# Altium PCB Main_Power_Uint_3rd.PcbDoc (part 3 of 3)
Units mil, origin at the board's own origin, x right, y up, seen from the top; angles counter-clockwise.
Board outline 3820 x 5360 mil, 6 copper layers (Top Layer, GND1, PWR, SIG, GND2, Bottom Layer), stack 34.824 mil thick; 251 components, 157 nets, 795 pads, 616 vias.
Unrouted connection lines stored in the file: 8.
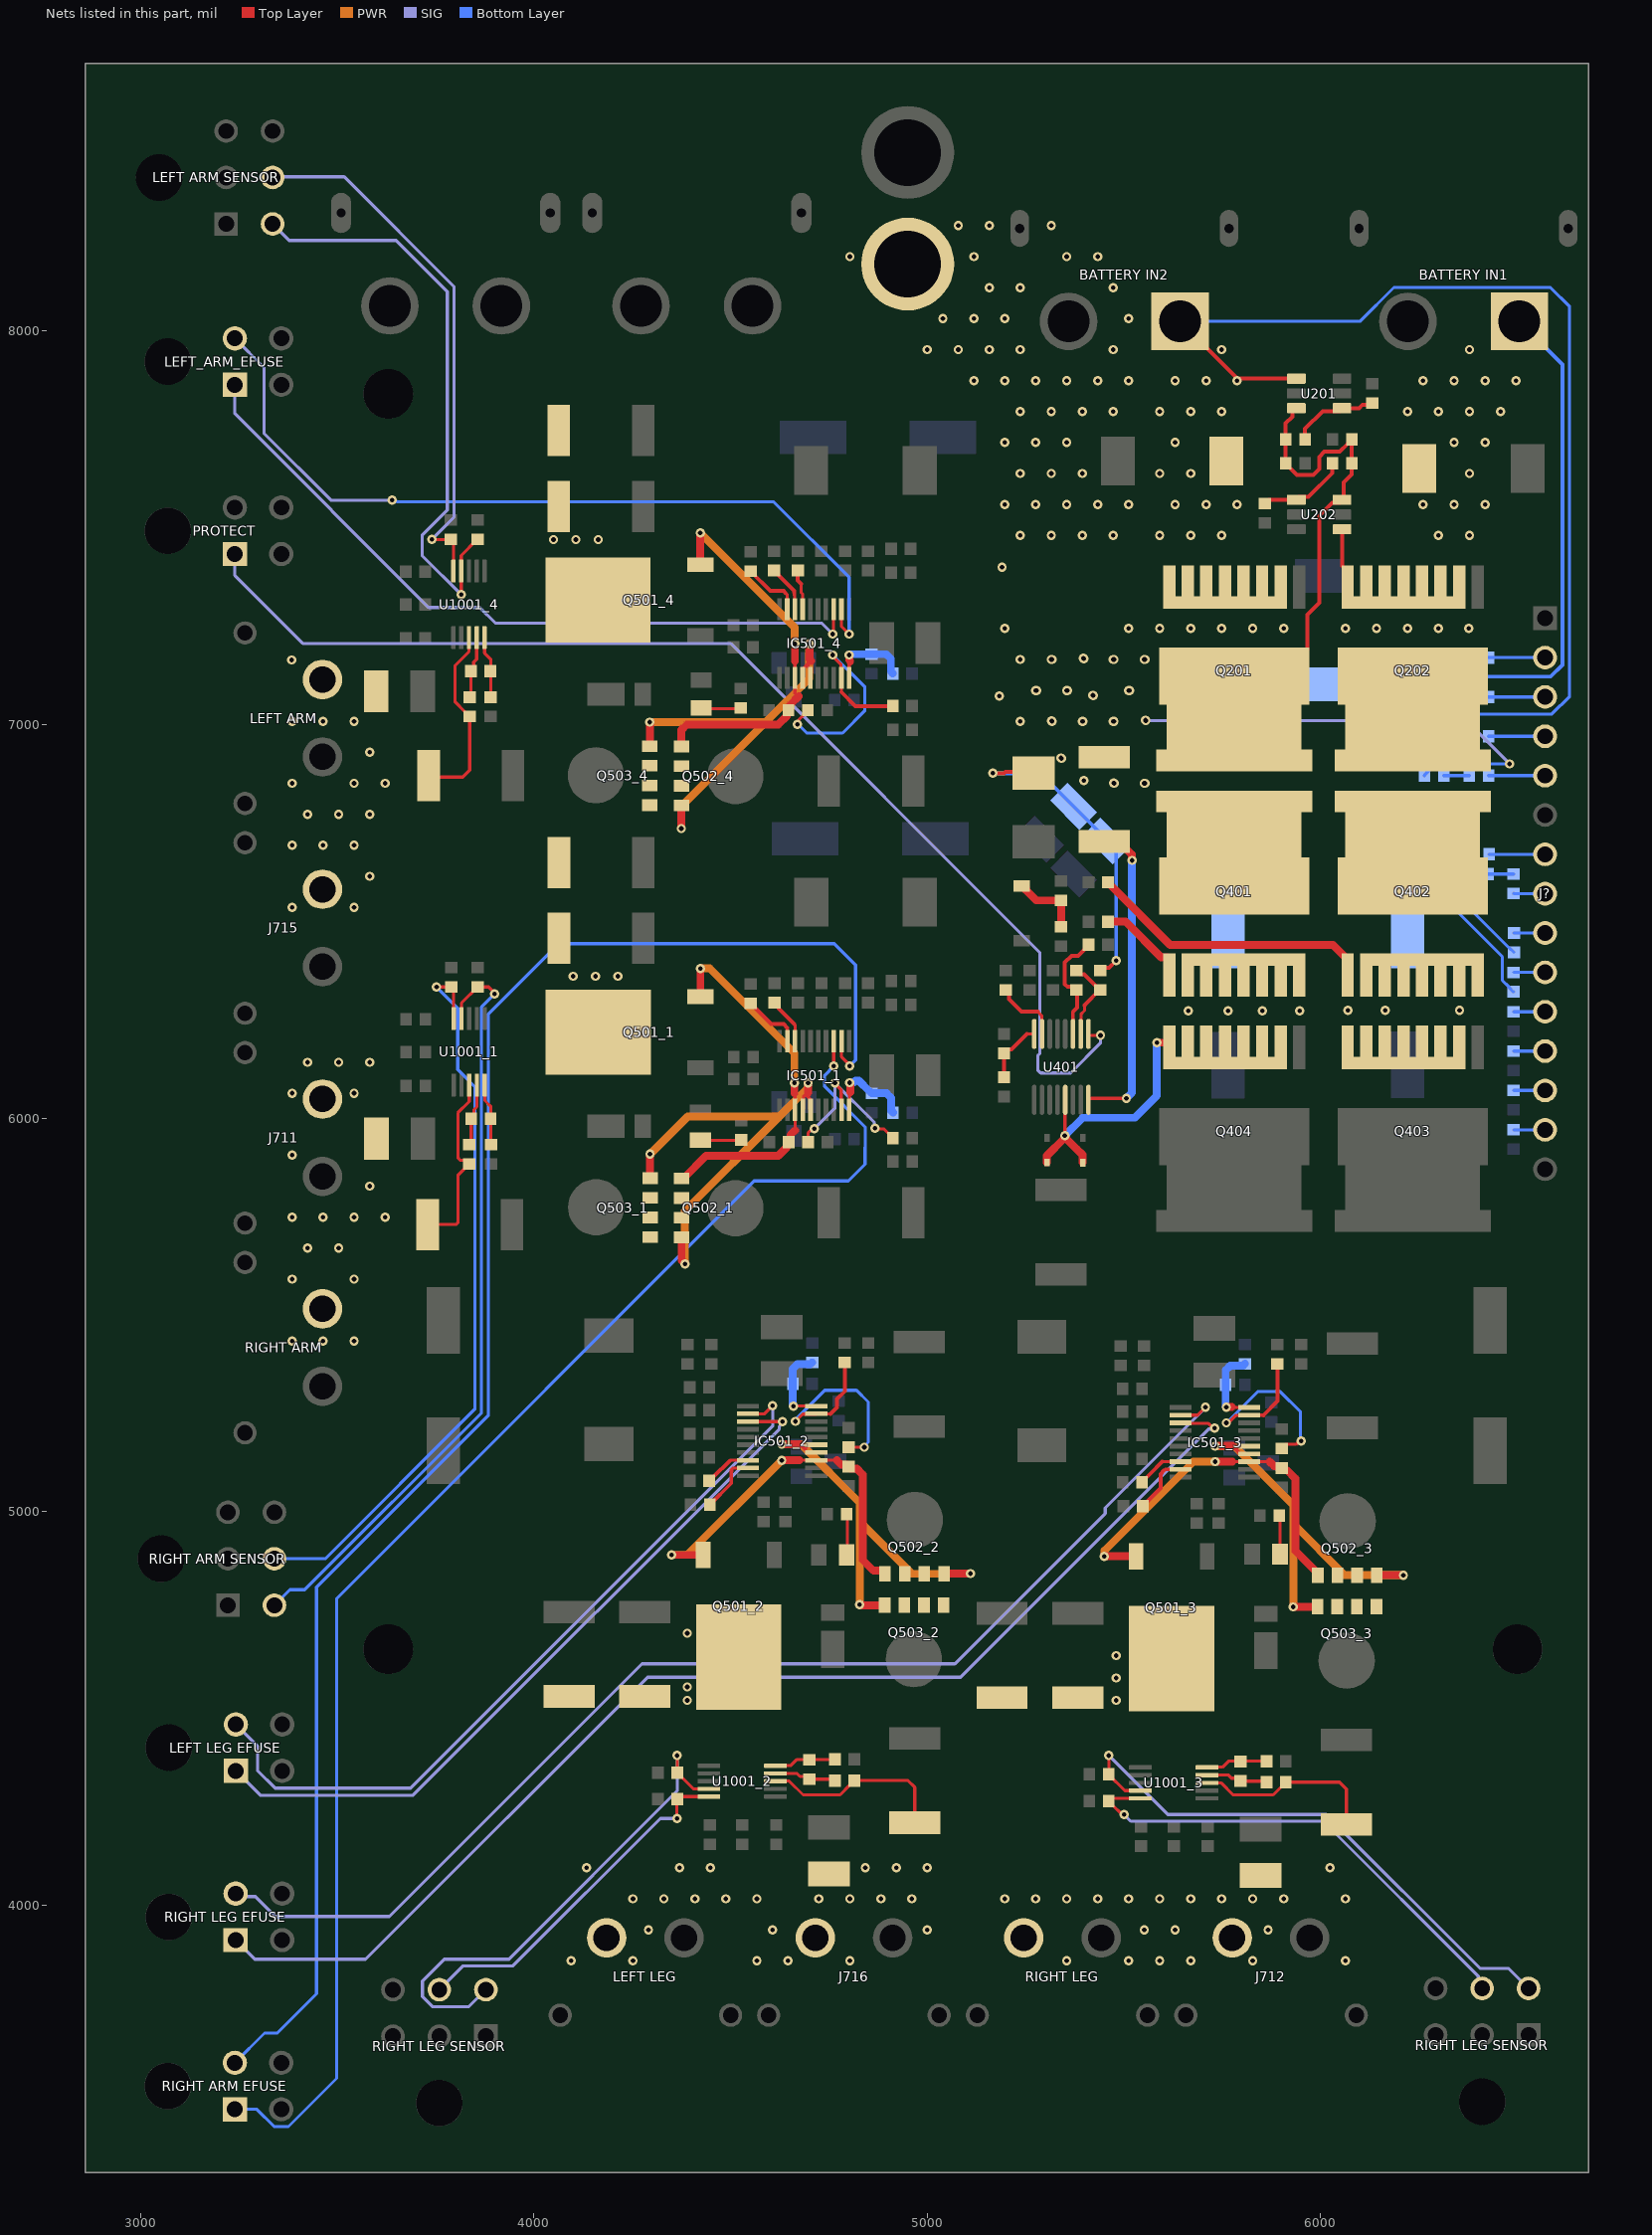
[diagram p7: the nets of this part, all layers, seen from the top]

## Via types
v1: diameter 23.62, hole 11.81, Top Layer to Bottom Layer, tented both sides, 369 vias
v2: diameter 23.62, hole 11.81, Top Layer to Bottom Layer, 240 vias
v3: diameter 23.62, hole 11.81, Top Layer to Bottom Layer, tented top, 7 vias

## Nets (pads, with @x,y where several pads share a name; then routed paths per layer and width w, separated by ;. In a path a pad name is that pad's centre, name@x,y a point inside that pad or via, vN(x,y) a via of type N, cw(c..) or ccw(c..) an arc to the next point about the centre after c; other vN are vias at no path point) (continued)
IMON_4: IC501_4.7 R503_4.2 | length 103.4
  Top Layer w8: 4679.13,7357.61 4679.43,7357.32 4679.43,7335.1 4683.15,7331.38 IC501_4.7@4683.15,7292.95
  Top Layer w10: R503_4.2@4670.76,7391.26 4670.76,7365.99 4679.13,7357.61
IN1: "BATTERY IN2.1" D201.1 Q201.2-8 R205.2 U201.4 | length 2803.3
  Top Layer w10: 5642.46,8024.41 5788.09,7878.78 U201.4@5937.96,7878.78
  Bottom Layer w8: 5642.46,8024.41 6099.55,8024.41 6185.7,8110.56 6583.39,8110.56 6632.12,8061.83 6632.12,7071.14 6587.42,7026.44 6318.81,7026.44 6263.35,6970.98 R205.2@6263.35,6970
  other v1: 5590.55,7480.32 5669.29,7480.32 5748.03,7480.32 5629.92,7559.06 5708.66,7559.06 5787.4,7559.06 5590.55,7637.8 5669.29,7637.8 5629.92,7716.54 5590.55,7795.28 5669.29,7795.28 5748.03,7795.28 5629.92,7874.02 5708.66,7874.02 5787.4,7874.02 5748.03,7952.76
IN2: "BATTERY IN1.1" D202.1 Q202.2-8 R207.2 U202.4 | length 1440.1
  Top Layer w10: U202.4@6054.1,7496.16 6054.1,7402.9 6068.27,7388.74 Q202.2-8@6068.27,7365.12
  Bottom Layer w10: R207.2@6263.35,7070 6273.11,7079.76 6273.11,7080.86 6313.89,7121.64 6584.03,7121.64 6614.12,7151.73 6614.12,7915.14 6504.85,8024.41
  other v1: 6299.22,7480.32 6377.96,7480.32 6259.85,7559.06 6338.59,7559.06 6417.33,7559.06 6377.96,7637.8 6338.59,7716.54 6417.33,7716.54 6220.48,7795.28 6299.22,7795.28 6377.96,7795.28 6456.7,7795.28 6259.85,7874.02 6338.59,7874.02 6417.33,7874.02 6496.07,7874.02 6377.96,7952.76
IN+_1: C1002_1.1 R1004_1.1 U1001_1.10 | length 157.9
  Top Layer w8: U1001_1.10@3875.07,6083.53 3875.07,6058.69 3875.67,6058.09 3875.67,6044.09 3890.98,6028.78 R1004_1.1@3890.98,5932.23
IN+_2: C1002_2.1 R1004_2.1 U1001_2.10 | length 158.3
  Top Layer w8: U1001_2.10@4614.09,4354.09 4638.93,4354.09 4639.53,4354.69 4653.53,4354.69 4668.84,4370 C1002_2.1@4699.75,4370 ; C1002_2.1@4699.75,4369.02 4700.73,4370 R1004_2.1@4765.39,4370
IN+_3: C1002_3.1 R1004_3.1 U1001_3.10 | length 157.9
  Top Layer w8: U1001_3.10@5710.75,4349.8 5735.59,4349.8 5736.19,4350.4 5750.19,4350.4 5765.5,4365.71 R1004_3.1@5862.05,4365.71
IN+_4: C1002_4.1 R1004_4.1 U1001_4.10 | length 157.9
  Top Layer w8: U1001_4.10@3874.49,7220.71 3874.49,7195.87 3875.09,7195.27 3875.09,7181.27 3890.4,7165.96 R1004_4.1@3890.4,7069.41
IN-_1: C1002_1.2 R1003_1.1 U1001_1.9 | length 159.9
  Top Layer w8: R1003_1.1@3835.7,5932.23 3840.79,5937.31 C1002_1.2@3840.79,5997.87 ; C1002_1.2@3839.8,5997.87 3847.61,6005.68 3847.61,6021 3855.39,6028.78 U1001_1.9@3855.39,6083.53
IN-_2: C1002_2.2 R1003_2.1 U1001_2.9 | length 159.1
  Top Layer w8: U1001_2.9@4614.09,4334.4 4668.84,4334.4 4676.62,4326.63 4691.94,4326.63 C1002_2.2@4699.75,4318.82 ; C1002_2.2@4699.75,4319.8 4762.13,4319.8 R1003_2.1@4765.39,4316.54
IN-_3: C1002_3.2 R1003_3.1 U1001_3.9 | length 157.5
  Top Layer w8: U1001_3.9@5710.75,4330.12 5765.5,4330.12 5773.28,4322.34 5788.6,4322.34 5796.41,4314.53 R1003_3.1@5861.76,4314.53
IN-_4: C1002_4.2 R1003_4.1 U1001_4.9 | length 159.1
  Top Layer w8: R1003_4.1@3836.93,7069.41 3840.2,7072.68 C1002_4.2@3840.2,7135.05 ; C1002_4.2@3839.22,7135.05 3847.03,7142.86 3847.03,7158.18 3854.8,7165.96 U1001_4.9@3854.8,7220.71
INP1: "RIGHT ARM EFUSE.1" IC501_1.3 | length 3712.4
  Top Layer w8: v2(4762.31,6131.9) IC501_1.3@4762.31,6195.12
  Bottom Layer w8: 3240.08,3480.94 3296.1,3480.94 3340,3437.04 3376.38,3437.04 3498.89,3559.55 3498.89,4778.89 4560,5840 4799.4,5840 4841.74,5882.34 4841.74,5924.84 4842.08,5925.18 4842.08,5977.11 4738.89,6080.3 4738.89,6108.47 v2(4762.31,6131.9)
INP2: "LEFT LEG EFUSE.1" IC501_2.3 | length 1902.6
  Top Layer w8: IC501_2.3@4543.78,5228.61 v2(4631.81,5228.61)
  SIG w8: 3242.55,4340.94 3304.46,4279.04 3693.08,4279.04 4624,5209.96 4624,5216.57 4631.81,5224.38 v2(4631.81,5228.61)
INP3: "RIGHT LEG EFUSE.1" IC501_3.3 | length 3158.5
  Top Layer w8: IC501_3.3@5643.78,5225.13 5644.56,5224.35 5713.5,5224.35 5725.78,5212.06 v2(5730.01,5212.06)
  SIG w8: 3242.29,3910.94 3290.87,3862.36 3572.36,3862.36 4289,4579 5084.2,4579 5714.8,5209.6 5727.55,5209.6 v2(5730.01,5212.06)
INP4: IC501_4.3 LEFT_ARM_EFUSE.1 | length 1889.3
  Top Layer w8: v2(4760,7229.73) 4761.11,7230.84 4761.11,7292.17 IC501_4.3@4761.89,7292.95
  SIG w8: LEFT_ARM_EFUSE.1@3240.08,7863.16 3240.08,7789.81 3732.53,7297.36 3862.64,7297.36 3902.4,7257.6 4732.13,7257.6 v2(4760,7229.73)
INP_G1: "RIGHT ARM EFUSE.2" IC501_1.2 | length 4316
  Top Layer w8: IC501_1.2@4782,6195.12 4782,6155.07 4802.27,6134.8 v2(4802.27,6131.9)
  Bottom Layer w8: 3240.08,3599.06 3315.67,3674.64 3348.22,3674.64 3447.89,3774.31 3447.89,4807.55 3884,5243.66 3884,6263.82 4063.18,6443 4763.71,6443 4817.72,6389 4817.72,6147.35 v2(4802.27,6131.9)
INP_G2: "LEFT LEG EFUSE.2" IC501_2.2 | length 1972.2
  Top Layer w8: IC501_2.2@4543.78,5248.29 4586.73,5248.29 v2(4607,5268.56)
  SIG w8: 3242.55,4459.06 3297.66,4403.94 3297.66,4341.85 3342.48,4297.04 3687.04,4297.04 4607,5217 v2(4607,5268.56)
INP_G3: "RIGHT LEG EFUSE.2" IC501_3.2 | length 3105
  Top Layer w8: IC501_3.2@5643.78,5244.81 5686.73,5244.81 v2(5706.88,5264.96)
  SIG w8: 3242.29,4029.06 3249.79,4021.55 3292.35,4021.55 3342.96,3970.95 3632.86,3970.95 4274.92,4613 5070.11,4613 5452.19,4995.08 5452.19,5009.03 5706.88,5263.72 v2(5706.88,5264.96)
INP_G4: IC501_4.2 LEFT_ARM_EFUSE.2 | length 2126.5
  Top Layer w8: IC501_4.2@4781.57,7292.95 4781.57,7249.41 v2(4801.26,7229.73)
  SIG w8: LEFT_ARM_EFUSE.2@3240.08,7981.27 3314.28,7907.06 3314.28,7739.65 3483.93,7570 v2(3640,7570)
  Bottom Layer w8: v2(3640,7570) 3642.99,7567.01 3651.49,7567.01 3652.5,7566 4609.3,7566 4801.26,7374.04 v2(4801.26,7229.73)
ISCP_1: C506_1.1 IC501_1.19 R509_1.1 | length 471.1
  Top Layer w8: C506_1.1@4697.1,5938.51 4697.1,5962.26 4704.31,5969.47 4710.11,5969.47 v2(4713.1,5972.46) ; v2(4765.1,6089.17) 4765.1,6087.73 4781.22,6071.62 4781.22,6021.73 IC501_1.19@4782,6020.95 ; v2(4867.42,5974.05) 4869.5,5971.96 4890.5,5971.96 4912.58,5949.89 R509_1.1@4912.58,5948.9
  SIG w8: v2(4713.1,5972.46) 4765.1,6024.46 v2(4765.1,6089.17) 4864.99,5989.29 4864.99,5976.48 v2(4867.42,5974.05)
ISCP_2: C506_2.1 IC501_2.19 R509_2.1 | length 635.1
  Top Layer w8: v2(4664.43,5228.94) 4683.01,5247.52 4717.17,5247.52 IC501_2.19@4717.95,5248.29 4754.25,5248.29 ; C506_2.1@4800.39,5163.39 v2(4840,5163.39)
  Top Layer w10: 4754.25,5248.29 4770.18,5264.22 4770.18,5285.71 4790,5305.54 R509_2.1@4790,5378.88
  Bottom Layer w8: v2(4664.43,5228.94) 4664.43,5233.16 4739.48,5308.21 4820.01,5308.21 4849.96,5278.26 4849.96,5175.89 4840,5165.93 v2(4840,5163.39)
ISCP_3: C506_3.1 IC501_3.19 R509_3.1 | length 623
  Top Layer w8: v2(5759.9,5225.13) 5764.13,5225.13 5783.03,5244.03 5817.17,5244.03 IC501_3.19@5817.95,5244.81 5854.25,5244.81 ; C506_3.1@5900.39,5159.91 5911.16,5170.67 5937.01,5170.67 5945.77,5179.44 v2(5950,5179.44)
  Top Layer w10: 5854.25,5244.81 5890,5280.56 R509_3.1@5890,5375.39
  Bottom Layer w8: v2(5759.9,5225.13) 5839.5,5304.73 5897.22,5304.73 5948.31,5253.63 5948.31,5181.12 v2(5950,5179.44)
ISCP_4: C506_4.1 IC501_4.19 R509_4.1 | length 675.3
  Top Layer w8: v2(4670,7000) 4672.99,7002.99 4672.99,7011.67 4696.67,7035.35 C506_4.1@4696.67,7036.33 ; v2(4760,7176.73) 4760,7173 4780.79,7152.21 4780.79,7119.56 IC501_4.19@4781.57,7118.77 4781.57,7082.48
  Top Layer w10: 4781.57,7082.48 4817.32,7046.73 R509_4.1@4912.15,7046.73
  Bottom Layer w8: v2(4670,7000) 4671.86,7000 4693.66,6978.2 4784.38,6978.2 4841.49,7035.3 4841.49,7095.24 v2(4760,7176.73)
IWRN_1: IC501_1.8 R504_1.2 | length 120.7
  Top Layer w8: 4661.13,6238.95 4663.89,6236.19 IC501_1.8@4663.89,6195.12
  Top Layer w10: R504_1.2@4611.18,6293.43 4612.17,6293.43 4621.93,6283.66 4621.93,6278.33 4661.13,6239.14 4661.13,6238.95
IWRN_2: IC501_2.8 R504_2.2 | length 120.7
  Top Layer w8: 4497.19,5128.02 4499.35,5130.18 IC501_2.8@4543.78,5130.18
  Top Layer w10: R504_2.2@4445.47,5077.48 4445.47,5078.46 4455.24,5088.23 4457.4,5088.23 4497.19,5128.02
IWRN_3: IC501_3.8 R504_3.2 | length 120.7
  Top Layer w8: 5597.19,5126.7 IC501_3.8@5643.78,5126.7
  Top Layer w10: R504_3.2@5545.47,5074 5545.47,5074.98 5565.9,5095.41 5597.19,5126.7
IWRN_4: IC501_4.8 R504_4.2 | length 120.4
  Top Layer w8: 4661.43,7335.26 4662.43,7334.26 4662.43,7328.06 4663.04,7327.45 4663.04,7293.37 IC501_4.8@4663.46,7292.95
  Top Layer w10: R504_4.2@4610.76,7390.4 4612.6,7390.4 4621.51,7381.49 4621.51,7379.65 4661.43,7339.73 4661.43,7335.26
"LED IN1": J?.4 R206.1 | length 143.3
  Bottom Layer w8: R206.1@6426.7,6970 J?.4@6570,6970
"LED IN2": J?.3 R208.1 | length 143.3
  Bottom Layer w8: R208.1@6426.69,7070 J?.3@6570,7070
LED_EFUSE_OUT1: J?.7 R414_1.1 | length 142.5
  Bottom Layer w8: R414_1.1@6427.48,6670 J?.7@6570,6670
LED_EFUSE_OUT2: J?.8 R414_2.1 | length 80.3
  Bottom Layer w8: R414_2.1@6490,6570.79 6490.79,6570 J?.8@6570,6570
LED_EFUSE_OUT3: J?.9 R414_3.1 | length 79.2
  Bottom Layer w8: R414_3.1@6490.79,6470 J?.9@6570,6470
LED_EFUSE_OUT4: J?.10 R414_4.1 | length 80
  Bottom Layer w8: R414_4.1@6490,6370 J?.10@6570,6370
LED_INA_VS1: J?.11 R1009_1.1 | length 80
  Bottom Layer w8: R1009_1.1@6490,6270 J?.11@6570,6270
LED_INA_VS2: J?.12 R1009_2.1 | length 80
  Bottom Layer w8: R1009_2.1@6490,6170 J?.12@6570,6170
LED_INA_VS3: J?.13 R1009_3.1 | length 80
  Bottom Layer w8: R1009_3.1@6490,6070 J?.13@6570,6070
LED_INA_VS4: J?.14 R1009_4.1 | length 80
  Bottom Layer w8: R1009_4.1@6490,5970 J?.14@6570,5970
LED_OR_OUT: J?.5 R204.1 | length 143.3
  Bottom Layer w8: R204.1@6426.7,6870 J?.5@6570,6870
LTC4364_FB: R406.1 R407.2 U401.16 | length 157.9
  Top Layer w8: 5253.66,6213.66 U401.16@5271.77,6213.66
  Top Layer w10: R406.1@5195.02,6103.66 R407.2@5195.02,6164.45 5204.79,6174.21 5214.21,6174.21 5253.66,6213.66
NetC403_2: C403.2 D404.1 R408.2 | length 185.8
  Top Layer w20: D404.1@5240,6589.88 5246.5,6589.88 5251.06,6585.31 5251.06,6578.82 5276.93,6552.95 C403.2@5340,6552.95 R408.2@5340,6486.26
NetC509_1_1: C509_1.1 R514_1.2 | length 103.6
  Top Layer w8: C509_1.1@4423.41,5943.47 4423.45,5943.43 4525.78,5943.43 R514_1.2@4526.65,5944.29
NetC509_2_1: C509_2.1 R514_2.2 | length 104.4
  Top Layer w8: R514_2.2@4794.61,4992.94 4796.46,4991.09 4796.46,4890.73 C509_2.1@4795.43,4889.71
NetC509_3_1: C509_3.1 R514_3.2 | length 98.2
  Top Layer w8: R514_3.2@5894.61,4989.46 5896.46,4987.61 5896.46,4903.91 C509_3.1@5896.46,4892.07
NetC509_4_1: C509_4.1 R514_4.2 | length 102.9
  Top Layer w8: C509_4.1@4424.77,7041.85 4426.35,7040.27 4524.37,7040.27 R514_4.2@4526.22,7042.12
NetJ?_2: J?.2 R414.1 | length 143.3
  Bottom Layer w8: R414.1@6426.69,7170 J?.2@6570,7170
NetQ401_1: Q401.1 R409.1 | length 234.7
  Top Layer w20: R409.1@5459.21,6499.09 5503.98,6499.09 5594.65,6408.43 5608.9,6408.43 5614.65,6402.68 Q401.1@5614.65,6363.31
NetQ402_1: Q402.1 R410.1 | length 730.4
  Top Layer w20: R410.1@5459.21,6599.09 5459.21,6598.11 5463.98,6593.35 5617.32,6440 6030.95,6440 6068.27,6402.68 Q402.1@6068.27,6363.31
NetQ501_1_2: Q501_1.2 R512_1.1 R513_1.1
  other v2: 4100,6360 4156.84,6360 4213.68,6360
NetQ501_2_2: Q501_2.2 R512_2.1 R513_2.1
  other v2: 4390,4520 4390,4554.19 4390,4690.52
NetQ501_3_2: Q501_3.2 R512_3.1 R513_3.1
  other v2: 5480,4520 5480,4576.84 5480,4633.68
NetQ501_4_2: Q501_4.2 R512_4.1 R513_4.1
  other v1: 4050,7470 4106.84,7470 4163.68,7470
NetR203_1: R203.1 R204.2 | length 64.9
  Bottom Layer w8: R203.1@6312.56,6870 R204.2@6377.48,6870
NetR205_1: R205.1 R206.2 | length 69.5
  Bottom Layer w8: R205.1@6312.56,6970 R206.2@6382.09,6970
NetR207_1: R207.1 R208.2 | length 67.7
  Bottom Layer w8: R207.1@6312.56,7070 6315.96,7073.4 6374.08,7073.4 R208.2@6377.48,7070
NetR413_1: R413.1 R414.2 | length 64.9
  Bottom Layer w8: R413.1@6312.56,7170 R414.2@6377.48,7170
NetR413_1_1: R413_1.1 R414_1.2 | length 65.7
  Bottom Layer w8: R413_1.1@6312.56,6670 R414_1.2@6378.27,6670
NetR413_2_1: R413_2.1 R414_2.2 | length 65.4
  Bottom Layer w8: R413_2.1@6424.61,6620 R414_2.2@6490,6620
NetR413_3_1: R413_3.1 R414_3.2 | length 273.6
  Bottom Layer w8: R413_3.1@6312.56,6620 6313.65,6618.91 6313.65,6596.94 6479.04,6431.55 6480.02,6431.55 R414_3.2@6490.79,6420.79
NetR413_4_1: R413_4.1 R414_4.2 | length 439.6
  Bottom Layer w8: R413_4.1@6210.79,6620 6210.79,6619.02 6221.56,6608.25 6226.2,6608.25 6259.5,6574.95 6296.03,6574.95 6461.25,6409.73 6461.25,6349.85 6478.25,6332.85 6478.25,6331.55 6489.02,6320.79 R414_4.2@6490,6320.79
OV: R402.1 R403.2 U401.11 | length 286.9
  Top Layer w8: U401.11@5370.2,6213.66 5370.2,6270.62 5373.01,6273.43
  Top Layer w10: 5373.01,6273.43 5380.62,6281.05 5380.62,6324.06 5370.77,6333.91 5356.09,6333.91 5349.54,6340.46 5349.54,6395.17 5366.53,6412.15 5383.25,6412.15 5410,6438.9 R403.2@5410,6439.88
PD_1: IC501_1.14 IC501_1.15 Q502_1.4 Q503_1.4 | length 1214.9
  Top Layer w8: IC501_1.14@4683.57,6020.95 4685.29,6022.66 4685.29,6054.16 4689.97,6058.85 4700.3,6058.85 ; 4691.2,6058.78 4701.35,6048.64 4701.35,6022.85 IC501_1.15@4703.26,6020.95 ; 4697.1,6064.06 4698.76,6058.39
  Top Layer w20: Q503_1.4@4295.33,5847.28 v2(4295.33,5908.03) ; Q502_1.4@4375.33,5696.45 4375.33,5638.7 4384.07,5629.96 v2(4384.07,5628.98) ; 4697.1,6064.06 v2(4697.1,6089.17)
  PWR w20: v2(4295.33,5908.03) 4391.31,6004.02 4624.02,6004.02 ; v2(4384.07,5628.98) 4384.07,5764.07 4624.02,6004.02 ; v2(4697.1,6089.17) 4696.4,6088.48 4696.4,6076.4 4624.02,6004.02
PD_2: IC501_2.14 IC501_2.15 Q502_2.4 Q503_2.4 | length 1116.5
  Top Layer w8: 4674.84,5170.83 4685.68,5160 ; IC501_2.14@4717.95,5149.87 4695.81,5149.87 4685.68,5160 ; IC501_2.15@4717.95,5169.55 4695.81,5169.55 4693.9,5167.65 4693.9,5164.69 4689.22,5160 4685.68,5160 ; Q503_2.4@4891.33,4761.33 Q503_2.4@4891.63,4761.62
  Top Layer w20: v2(4630,5170.83) 4674.84,5170.83 ; v2(4828.12,4763.21) 4829.1,4763.21 4830.98,4761.33 Q503_2.4@4891.33,4761.33 ; Q502_2.4@5042.45,4841.62 5042.75,4841.92 5109.1,4841.92 v2(5109.4,4842.22)
  PWR w20: v2(4630,5170.83) 4679.35,5170.83 4826.71,5023.48 ; v2(4828.12,4763.21) 4828.12,5022.06 ; 4830.12,4972.41 4960.9,4841.62 5108.8,4841.62 v2(5109.4,4842.22)
PD_3: IC501_3.14 IC501_3.15 Q502_3.4 Q503_3.4 | length 1115
  Top Layer w8: 5774.84,5167.35 5782.19,5160 ; IC501_3.14@5817.95,5146.39 5795.81,5146.39 5782.19,5160 ; IC501_3.15@5817.95,5166.07 5795.81,5166.07 5789.74,5160 5782.19,5160 ; Q503_3.4@5991.33,4757.85 Q503_3.4@5991.62,4758.14
  Top Layer w20: v2@5732.88,5167.25 5733.37,5166.76 5734.95,5166.76 5735.53,5167.35 5774.84,5167.35 ; v2(5930,4757.85) Q503_3.4@5991.33,4757.85 ; Q502_3.4@6142.45,4838.14 v2(6210,4838.14)
  PWR w20: v2(5731.69,5166.07) 5780.63,5166.07 5930,5016.7 5930,4969.04 ; v2(5930,4757.85) 5930,4969.04 ; v2(6210,4838.14) 6060.9,4838.14 5930,4969.04
PD_4: IC501_4.14 IC501_4.15 Q502_4.4 Q503_4.4 | length 1151.8
  Top Layer w8: IC501_4.14@4683.15,7118.77 4683.15,7140.92 4696.67,7154.44 ; IC501_4.15@4702.83,7118.78 4702.83,7140.92 4696.67,7147.08 4696.67,7154.44 ; 4704.11,7161.89 4696.67,7154.44
  Top Layer w20: Q503_4.4@4294.9,6945.1 v2(4294.9,7005.86) ; v2(4374.9,6735.55) Q502_4.4@4374.9,6794.28 ; v2@4700.69,7204.34 4700.69,7165.3 4704.11,7161.89
  PWR w20: v2(4294.9,7005.86) 4589.13,7005.86 ; v2(4374.9,6735.55) 4374.9,6791.63 4589.13,7005.86 ; v2(4700,7205.04) 4700,7116.73 4589.13,7005.86
SCL_1: "RIGHT ARM SENSOR.5" R1005_1.2 U1001_1.5 | length 1900
  Top Layer w8: v2(3752.75,6333.01) R1005_1.2@3789.8,6333.01 3796.33,6326.48 U1001_1.5@3796.33,6252.82
  Bottom Layer w8: 3340.74,4880 3470,4880 3850,5260 3850,6079.52 3806.53,6123 3806.53,6143.55 3806.62,6143.64 3806.62,6279.14 v2(3752.75,6333.01)
SCL_2: "RIGHT LEG SENSOR.5"@3760,3784.9 R1005_2.2 U1001_2.5 | length 916
  Top Layer w8: v2(4363.67,4219.95) 4363.67,4267.89 4371.14,4275.35 U1001_2.5@4444.8,4275.35
  SIG w8: 3760,3784.9 3820.56,3845.46 3947.09,3845.46 4321.58,4219.95 v2(4363.67,4219.95)
SCL_3: "RIGHT LEG SENSOR.5"@6410,3788.19 R1005_3.2 U1001_3.5 | length 1242
  Top Layer w8: v2(5500,4230) 5495.77,4230 5485.47,4240.3 5484.51,4240.3 5461.26,4263.55 R1005_3.2@5461.26,4264.53 5467.79,4271.06 U1001_3.5@5541.46,4271.06
  SIG w8: v2(5500,4230) 5517,4213 6006.46,4213 6400.08,3819.38 6400.08,3798.11 6410,3788.19
SCL_4: "LEFT ARM SENSOR.5" R1005_4.2 U1001_4.5 | length 1374.8
  Top Layer w8: v2(3740.72,7470.2) R1005_4.2@3789.22,7470.2 3795.75,7463.67 U1001_4.5@3795.75,7390
  SIG w8: 3336.06,8390 3337.95,8391.89 3518.11,8391.89 3797,8113 3797,7526.48 v2(3740.72,7470.2)
SDA_1: "RIGHT ARM SENSOR.4" R1006_1.2 U1001_1.4 | length 1956.8
  Top Layer w8: U1001_1.4@3816.02,6252.82 3816.02,6292.27 3856.76,6333.01 R1006_1.2@3857.74,6333.01 3885.49,6333.01 3900.14,6318.37 v2(3900.14,6315.05)
  Bottom Layer w8: 3340.74,4761.89 3380.25,4801.39 3417.69,4801.39 3867,5250.7 3867,6282.19 3899.86,6315.05 v2(3900.14,6315.05)
SDA_2: "RIGHT LEG SENSOR.4"@3878.11,3784.9 R1006_2.2 U1001_2.4 | length 1307
  Top Layer w8: v2(4364.38,4380) 4364.38,4336.98 R1006_2.2@4364.61,4336.76 ; R1006_2.2@4364.61,4335.77 4405.35,4295.03 U1001_2.4@4444.8,4295.03
  SIG w8: 3878.11,3784.9 3835.19,3741.98 3742.22,3741.98 3717.08,3767.12 3717.08,3807.08 3772.46,3862.46 3936.92,3862.46 4364.38,4289.92 v2(4364.38,4380)
SDA_3: "RIGHT LEG SENSOR.4"@6528.11,3788.19 R1006_3.2 U1001_3.4 | length 1456.6
  Top Layer w8: R1006_3.2@5461.26,4331.49 5502.01,4290.75 U1001_3.4@5541.46,4290.75 ; R1006_3.2@5461.26,4332.47 v2(5461.26,4380)
  SIG w8: v2(5461.26,4380) 5611.26,4230 6013.51,4230 6404.62,3838.89 6477.41,3838.89 6528.11,3788.19
SDA_4: "LEFT ARM SENSOR.4" R1006_4.2 U1001_4.4 | length 1511
  Top Layer w8: v2(3815.43,7330) U1001_4.4@3815.43,7390 3815.43,7429.45 3856.17,7470.2 R1006_4.2@3857.16,7470.2
  SIG w8: 3336.06,8271.89 3377.95,8230 3650,8230 3780,8100 3780,7544.56 3715.91,7480.47 3715.91,7429.52 v2(3815.43,7330)
SENSE_OUT1: "RIGHT ARM.2" C1001_1.1 J711.2 R1002_1.2 R1003_1.2 U1001_1.8 | length 471.3
  Top Layer w8: R1002_1.2@3730.24,5729.35 3802.27,5729.35 3806.95,5734.04 3806.95,5854.27 R1003_1.2@3835.7,5883.01 3826.31,5892.41 3813.61,5892.41 3806.95,5899.06 3806.95,6012.93 3835.7,6041.68 U1001_1.8@3835.7,6083.53
  other v1: 3385.83,5433.07 3464.57,5433.07 3543.31,5433.07 3385.83,5590.55 3543.31,5590.55 3425.2,5669.29 3503.94,5669.29 3385.83,5748.03 3464.57,5748.03 3543.31,5748.03 3622.05,5748.03 3582.68,5826.77 3385.83,5905.52 3385.83,6063 3543.31,6063 3425.2,6141.74 3503.94,6141.74 3582.68,6141.74
SENSE_OUT2: "LEFT LEG.2" C1001_2.1 J716.2 R1002_2.2 R1003_2.2 U1001_2.8 | length 481.7
  Top Layer w8: U1001_2.8@4614.09,4314.72 4614.53,4315.15 4649.14,4315.15 4684.29,4280 4778.07,4280 4802.36,4304.29 4803.34,4304.29 4814.61,4315.55 R1003_2.2@4814.61,4316.54 4950.84,4316.54 4968.27,4299.11 R1002_2.2@4968.27,4209.25
  other v1: 4094.49,3858.27 4251.97,3858.27 4566.93,3858.27 4645.67,3858.27 4803.15,3858.27 4291.34,3937.01 4606.3,3937.01 5000,3937.01 4251.97,4015.75 4330.71,4015.75 4409.45,4015.75 4488.19,4015.75 4566.93,4015.75 4724.41,4015.75 4803.15,4015.75 4881.89,4015.75 4960.63,4015.75 4133.86,4094.49 4370.08,4094.49 4448.82,4094.49 4842.52,4094.49 4921.26,4094.49 5000,4094.49
SENSE_OUT3: "RIGHT LEG.2" C1001_3.1 J712.2 R1002_3.2 R1003_3.2 U1001_3.8 | length 477.8
  Top Layer w8: U1001_3.8@5710.75,4310.43 5746.23,4310.43 5776.66,4280 5879.02,4280 5899.02,4300 5900,4300 5911.26,4311.26 R1003_3.2@5911.26,4312.25 6047.5,4312.25 6064.93,4294.82 R1002_3.2@6064.93,4204.96
  other v1: 5354.33,3858.27 5511.81,3858.27 5590.55,3858.27 5669.29,3858.27 5826.77,3858.27 6063,3858.27 5551.18,3937.01 5629.92,3937.01 5866.14,3937.01 5196.85,4015.75 5275.59,4015.75 5354.33,4015.75 5433.07,4015.75 5511.81,4015.75 5590.55,4015.75 5669.29,4015.75 5748.03,4015.75 5826.77,4015.75 5905.52,4015.75 6063,4015.75 6023.63,4094.49
SENSE_OUT4: "LEFT ARM.2" C1001_4.1 J715.2 R1002_4.2 R1003_4.2 U1001_4.8 | length 481.7
  Top Layer w8: R1002_4.2@3729.65,6866.53 3819.51,6866.53 3836.93,6883.96 R1003_4.2@3836.93,7020.2 3835.95,7020.2 3824.69,7031.46 3824.69,7032.44 3800,7057.13 3800,7150.12 3835.12,7185.23 U1001_4.8@3835.12,7220.71
  other v1: 3385.83,6535.44 3385.83,6535.44 3543.31,6535.44 3543.31,6535.44 3582.68,6614.18 3582.68,6614.18 3385.83,6692.92 3385.83,6692.92 3464.57,6692.92 3464.57,6692.92 3543.31,6692.92 3543.31,6692.92 3425.2,6771.66 3425.2,6771.66 3503.94,6771.66 3503.94,6771.66 3582.68,6771.66 3582.68,6771.66 3385.83,6850.4 3385.83,6850.4 3543.31,6850.4 3543.31,6850.4 3622.05,6850.4 3622.05,6850.4 3582.68,6929.14 3582.68,6929.14 3385.83,7007.88 3385.83,7007.88 3464.57,7007.88 3464.57,7007.88 3543.31,7007.88 3543.31,7007.88 3384.26,7163.79 3384.26,7163.79
SHDN: PROTECT.1 U401.9 | length 3045
  Top Layer w8: U401.9@5409.57,6213.66 5409.57,6212.22 5411.79,6210 v2(5440,6210)
  SIG w8: PROTECT.1@3240.08,7433.16 3240.08,7378.59 3412.67,7206 4500.22,7206 5286,6420.22 5286,6163.71 5280.5,6158.21 5280.5,6121.79 5288.1,6114.19 5364.19,6114.19 5440,6190 v2(5440,6210)
SOURCE: D402.2 D403.2 Q401.2-8 Q402.2-8 Q403.2-8 Q404.2-8 U401.5 | length 709.4
  Top Layer w8: v2(5349.36,5955) 5349.94,5955.57 5349.94,6045.77 U401.5@5350.51,6046.34
  Top Layer w20: D403.2@5303.85,5886.83 5303.85,5903.73 5348.67,5948.56 5348.67,5954.31 v2(5349.36,5955) 5350.06,5954.31 5350.06,5950.95 5380.41,5920.6 5394.8,5906.2 D402.2@5394.8,5887.07 ; v2(5583.2,6191.56) 5611.09,6191.56 Q404.2-8@5614.65,6195.12
  Bottom Layer w20: v2(5349.36,5955) 5395.08,6000.72 5527.41,6000.72 5583.2,6056.5 v2(5583.2,6191.56)
  other v2: 5662.81,6272.76 5764.19,6272.76 5851.79,6272.76 5946.28,6272.76 6068.89,6273.98 6163.68,6273.68 6352.65,6273.68
SRC_1: C505_1.2 IC501_1.13 Q501_1.3 Q502_1.1 Q502_1.2 Q502_1.3 Q503_1.1 Q503_1.2 Q503_1.3 | length 948.8
  Top Layer w8: 4662.29,6063.58 4663.89,6061.98 IC501_1.13@4663.89,6020.95 4663.89,5968.9
  Top Layer w20: Q502_1.1@4375.33,5846.45 4380.25,5846.45 4437.58,5903.78 4575.71,5903.78 ; Q501_1.3@4423.41,6308.19 v2(4423.41,6380) ; 4575.73,5903.76 4621,5903.76 4642.82,5925.57 4642.82,5933.74 C505_1.2@4647.58,5938.51 4652.34,5943.27 4652.34,5957.36 4663.89,5968.9 ; 4662.29,6063.58 v2(4662.29,6089.17)
  PWR w20: v2(4423.41,6380) 4447.16,6380 4662.29,6164.87 v2(4662.29,6089.17)
SRC_2: C505_2.2 IC501_2.13 Q501_2.3 Q502_2.1 Q502_2.2 Q502_2.3 Q503_2.1 Q503_2.2 Q503_2.3 | length 964.7
  Top Layer w8: 4680,5130.18 IC501_2.13@4717.95,5130.18 4770,5130.18
  Top Layer w20: v2(4350,4889.71) Q501_2.3@4430.71,4889.71 ; v2(4630,5130.18) 4674.84,5130.18 ; 4770,5130.18 4781.55,5118.64 4795.63,5118.64 4805.16,5109.11 4820.59,5109.11 4835.58,5094.12 4835.58,4877.33 4863.43,4849.48 4887.68,4849.48 4892.3,4844.87 Q502_2.1@4892.3,4841.77
  PWR w20: v2(4350,4889.71) 4389.52,4889.71 v2@4629.31,5129.49
SRC_3: C505_3.2 IC501_3.13 Q501_3.3 Q502_3.1 Q502_3.2 Q502_3.3 Q503_3.1 Q503_3.2 Q503_3.3 | length 955.8
  Top Layer w8: 5780,5126.7 IC501_3.13@5817.95,5126.7 5870,5126.7
  Top Layer w20: v2(5450,4886.22) Q501_3.3@5530.71,4886.22 ; v2(5731.81,5126.7) 5774.84,5126.7 ; 5870,5126.7 5881.55,5115.16 5895.63,5115.16 5905.16,5105.63 5913.33,5105.63 5935.14,5083.81 5935.14,4900.37 5992.45,4843.06 Q502_3.1@5992.45,4838.14
  PWR w20: v2(5450,4886.22) 5450.69,4886.92 5450.69,4901.05 5675.87,5126.22 5731.33,5126.22 v2(5731.81,5126.7)
SRC_4: C505_4.2 IC501_4.13 Q501_4.3 Q502_4.1 Q502_4.2 Q502_4.3 Q503_4.1 Q503_4.2 Q503_4.3 | length 965.1
  Top Layer w8: 4663.46,7156.73 4663.46,7078.72 4670.58,7071.6 4672.78,7071.6
  Top Layer w20: Q502_4.1@4374.9,6944.28 4374.9,6985.92 4388.98,7000 4621.1,7000 C505_4.2@4642.39,7021.29 ; Q501_4.3@4422.99,7406.02 v2(4422.98,7486.73) ; C505_4.2@4647.15,7036.33 4651.92,7041.1 4651.92,7050.74 4672.78,7071.6 ; 4663.46,7161.89 v2(4663.46,7204.92)
  PWR w20: v2(4422.98,7486.73) 4662.99,7246.73 4662.99,7205.39 v2(4663.46,7204.92)
TMR: C401.2 U401.15 | length 173.9
  Top Layer w8: 5281.09,6270 5286.04,6265.05 5290.73,6260.36 5290.73,6214.39 U401.15@5291.46,6213.66
  Top Layer w10: C401.2@5199.88,6325.39 5207.95,6317.32 5207.95,6301.74 5239.69,6270 5281.09,6270
TMR_1: C503_1.2 IC501_1.9 | length 153.5
  Top Layer w8: IC501_1.9@4644.2,6195.12 4644.2,6229.19
  Top Layer w10: C503_1.2@4551.18,6291.46 4552.17,6291.46 4561.93,6281.7 4561.93,6280.71 4603.96,6238.68 4634.72,6238.68 4644.2,6229.19
TMR_2: C503_2.2 IC501_2.9 | length 153.3
  Top Layer w8: 4501.87,5105.83 4506.54,5110.5 IC501_2.9@4543.78,5110.5
  Top Layer w10: C503_2.2@4448.43,5018.46 4501.73,5071.77 4501.73,5102.52 4501.87,5102.66 4501.87,5105.83
TMR_3: C503_3.2 IC501_3.9 | length 155.6
  Top Layer w8: 5600.79,5103.42 5604.38,5107.02 IC501_3.9@5643.78,5107.02
  Top Layer w10: C503_3.2@5548.43,5014 5548.43,5014.98 5592.84,5059.4 5592.84,5095.48 5600.79,5103.42
TMR_4: C503_4.2 IC501_4.9 | length 153.5
  Top Layer w8: 4639.26,7335.02 4643.78,7330.51 IC501_4.9@4643.78,7292.95
  Top Layer w10: C503_4.2@4551.74,7388.3 4600.59,7339.46 4634.83,7339.46 4639.26,7335.02
UV: R401.1 R402.2 U401.10 | length 211
  Top Layer w8: U401.10@5389.88,6213.66 5390.61,6214.39 5390.61,6263.9 5399.62,6272.91 5399.62,6285.94
  Top Layer w10: R402.2@5379.29,6374.61 5389.05,6364.84 5398.66,6364.84 5409.35,6354.16 5409.35,6354.04 5417.55,6345.84 5417.66,6345.84 5438.11,6325.39 5399.62,6286.91 5399.62,6285.94
VCC: R404.1 U401.8 | length 808.2
  Top Layer w8: U401.8@5409.57,6046.34 5409.57,6048.24 5411.33,6050 v2(5505.81,6050)
  Top Layer w20: R404.1@5450,6702.72 5486.42,6702.72 5519.76,6669.38 5519.76,6655.33 v2(5520.45,6654.64)
  Bottom Layer w20: v2(5505.81,6050) 5519.76,6063.95 5519.76,6653.95 v2(5520.45,6654.64)
VS1: C201.2 R201.1 U201.1 | length 223
  Top Layer w10: R201.1@5960.02,7725.78 5960.02,7751.21 6005,7796.18 6046.31,7796.18 U201.1@6054.1,7803.98 6097.2,7803.98 6105.51,7812.29 6125.92,7812.29 C201.2@6130.4,7816.77
VS2: C202.2 R202.1 U202.1 | length 227.7
  Top Layer w10: C202.2@5858.19,7561.06 5859.17,7561.06 5868.94,7570.83 5874.66,7570.83 5874.79,7570.96 U202.1@5937.96,7570.96 5945.76,7578.76 5968.76,7578.76 6028.55,7638.55 6028.55,7662.49 R202.1@6029.5,7663.44
VS_1: C507_1.1 IC501_1.20 R508_1.1 | length 234.3
  Top Layer w8: IC501_1.20@4801.68,6020.95 4801.68,6062.72 4804.22,6065.25
  Top Layer w20: v2(4802.7,6089.76) 4802.7,6088.78 4804.22,6087.26 4804.22,6065.25
  Bottom Layer w20: v2(4802.7,6089.76) 4803.39,6090.45 4813.59,6090.45 4817.72,6094.58 4826.02,6094.58 4853.08,6067.52 4854.07,6067.52 C507_1.1@4858.83,6062.76 ; C507_1.1@4859.82,6062.76 4896.27,6062.76 4907.98,6051.04 4907.98,6018.31 R508_1.1@4912.75,6013.54
VS_2: C507_2.1 IC501_2.20 R508_2.1 | length 208.3
  Top Layer w8: v2(4659.88,5267.98) IC501_2.20@4717.95,5267.98
  Bottom Layer w20: C507_2.1@4658.11,5324.96 4658.11,5270.73 4659.88,5268.96 v2(4659.88,5267.98) ; C507_2.1@4658.11,5325.94 4658.11,5362.4 4669.83,5374.11 4702.56,5374.11 R508_2.1@4707.32,5378.88
VS_3: C507_3.1 IC501_3.20 R508_3.1 | length 208.4
  Top Layer w8: 5773.65,5265.69 5774.84,5264.5 IC501_3.20@5817.95,5264.5
  Top Layer w20: v2(5759.9,5265.08) 5760.51,5265.69 5773.65,5265.69
  Bottom Layer w20: C507_3.1@5758.11,5321.48 5758.11,5267.85 5759.9,5266.06 v2(5759.9,5265.08) ; C507_3.1@5758.11,5322.46 5758.11,5358.91 5769.83,5370.63 5802.56,5370.63 R508_3.1@5807.32,5375.39
VS_4: C507_4.1 IC501_4.20 R508_4.1 | length 209.3
  Top Layer w8: IC501_4.20@4801.26,7118.77 4801.26,7158.01 4803.79,7160.54
  Top Layer w20: v2@4801.26,7175.75 4801.95,7175.06 4801.95,7163.58 4803.79,7161.74 4803.79,7160.54
  Bottom Layer w20: v2(4801.26,7176.73) 4802.24,7176.73 4804.13,7178.62 C507_4.1@4858.24,7178.62 ; C507_4.1@4859.22,7178.62 4895.67,7178.62 4907.39,7166.9 4907.39,7134.17 R508_4.1@4912.15,7129.41
VSYS_IN: "48V OUT.2" C203.2 C204.1 C205.1 C206.2 C207.2 C208.2 D203.1 D401.1 Q201.Tab Q202.Tab Q401.Tab Q402.Tab R201.2 R202.2 R203.2 R401.2 R404.2 U201.6 U202.6 | length 3235.3
  Top Layer w10: v1(5166.39,6876.39) 5194.6,6876.39 5198.21,6880 5266.06,6880 D401.1@5270,6876.06 ; R401.2@5439.09,6374.61 5445.74,6381.25 5461.25,6381.25 v1(5480,6400) ; Q201.Tab@5780,7122.99 5780,7120 5895.12,7120 5965.94,7190.83 5965.94,7279.3 5995.88,7309.23 5995.88,7530.43 6028.62,7563.17 6046.31,7563.17 U202.6@6054.1,7570.96 6058.25,7575.11 6058.25,7592.9 6058.26,7614.94 6078.71,7635.39 R202.2@6078.71,7663.44 C208.2@6078.71,7724.8 6068.95,7715.03 6068.95,7713.94 6048.2,7693.18 6008.94,7693.18 5995.69,7679.94 5995.69,7648.8 5980.58,7633.69 5939.46,7633.69 5931.26,7641.89 5931.26,7642 5910.81,7662.45 C203.2@5910.81,7663.44 R201.2@5910.81,7724.8 5910.81,7765.23 5927.62,7782.04 5927.62,7796.18 5935.41,7803.98 U201.6@5937.96,7803.98
  SIG w8: v1(5555.14,7009.95) 6370.05,7009.95 v1(6480,6900)
  Bottom Layer w8: R203.2@6263.35,6870 6263.35,6870.98 6292.36,6900 v1(6480,6900)
  Bottom Layer w10: v1(5166.39,6876.39) 5287.12,6876.39 C206.2@5371.76,6791.76 5480,6683.52 v1(5480,6400)
  other v1: 5551.18,6850.4 5553.07,6850.4 5474.51,6850.58 5473.57,6851.52 5397.46,6857.46 5341,6913.91 5340.05,6914.86 5236.22,7007.88 5317.03,7008.06 5393.7,7007.88 5395.59,7007.88 5472.44,7007.88 5474.33,7007.88 5316.09,7009 5554.2,7010.89 5182.57,7072.34 5421.63,7073.28 5420.68,7074.23 5275.59,7086.62 5277.48,7086.62 5354.33,7086.62 5356.22,7086.62 5511.81,7086.62 5513.7,7086.62 5236.22,7165.36 5314.96,7165.36 5316.85,7165.36 5472.44,7165.36 5474.33,7165.36 5551.18,7165.36 5553.07,7165.36 5397.66,7167.43 5396.72,7168.37 5196.85,7244.1 5511.81,7244.1 5590.55,7244.1 5669.29,7244.1 5748.03,7244.1 5826.77,7244.1 5905.52,7244.1 6063,7244.1 6141.74,7244.1 6220.48,7244.1 6299.22,7244.1 6376.01,7244.1 5190,7400 5236.22,7480.32 5314.96,7480.32 5393.7,7480.32 5472.44,7480.32 5196.85,7559.06 5275.59,7559.06 5354.33,7559.06 5433.07,7559.06 5511.81,7559.06 5236.22,7637.8 5314.96,7637.8 5393.7,7637.8 5196.85,7716.54 5275.59,7716.54 5354.33,7716.54 5236.22,7795.28 5314.96,7795.28 5393.7,7795.28 5472.44,7795.28 5118.11,7874.02 5196.85,7874.02 5275.59,7874.02 5354.33,7874.02 5433.07,7874.02 5511.81,7874.02 5000,7952.76 5078.74,7952.76 5157.48,7952.76 5236.22,7952.76 5472.44,7952.76 5039.37,8031.5 5118.11,8031.5 5196.85,8031.5 5511.81,8031.5 5157.48,8110.24 5236.22,8110.24 5472.44,8110.24 4803.15,8188.98 5118.11,8188.98 5354.33,8188.98 5433.07,8188.98 5078.74,8267.72 5157.48,8267.72 5314.96,8267.72
pads on no net: "BATTERY IN1.S1" "BATTERY IN1.S2" "BATTERY IN2.S1" "BATTERY IN2.S2" "LEFT ARM SENSOR.3" "LEFT ARM SENSOR.7" "LEFT ARM.3" "LEFT ARM.4" "LEFT LEG EFUSE." "LEFT LEG.3" "LEFT LEG.4" "PROTECT OUT.S1" "PROTECT OUT.S2" "RIGHT ARM EFUSE." "RIGHT ARM SENSOR.3" "RIGHT ARM SENSOR.7" "RIGHT ARM.3" "RIGHT ARM.4" "RIGHT LEG EFUSE." "RIGHT LEG SENSOR.3" "RIGHT LEG SENSOR.7" "RIGHT LEG.3" "RIGHT LEG.4" IC501_1.16 IC501_2.16 IC501_3.16 IC501_4.16 J408.S1 J408.S2 J711.3 J711.4 J712.3 J712.4 J715.3 J715.4 J716.3 J716.4 J?.6 LEFT_ARM_EFUSE. PROTECT. PROTECT.4 U401.3 U401.7

## Polygon pours and split planes (outlines as drawn)
SOURCE on Top Layer "SOURCE_L01_P196" (solid, pour order 196): 5600,6120 5600,6240 5640,6280 5640,6420 6100,6420 6420,6420 6420,6290 6370,6240 6370,6120
GND on Top Layer "GND_L01_P228" (solid, remove dead copper, pour order 228): 2870,3320 2870,8661.42 6680,8661.42 6680,3320
SENSE_OUT4 on Top Layer "SENSE_OUT4_L01_P024" (solid, pour order 24): 3636.81,6934.98 3761.3,6934.98 3761.3,6804.93 3636.81,6804.93 3636.81,6459.68 3320,6459.68 3320,7280 3636.81,7280
SENSE_OUT3 on Top Layer "SENSE_OUT3_L01_P044" (solid, pour order 44): 6000.36,4233.24 5872.89,4105.77 5163.02,4105.77 5163.02,3769.68 6130,3769.68 6130,4233.24
SENSE_OUT2 on Top Layer "SENSE_OUT2_L01_P047" (solid, pour order 47): 4903.72,4237.61 4776.25,4110.14 4066.38,4110.14 4066.38,3774.05 5033.36,3774.05 5033.36,4237.61
VSYS_IN on Top Layer "VSYS_IN_L01_P048" (solid, pour order 48): 5550,6490 5610,6430 6440,6430 6440,7280 5576.89,7280 5576.89,8093.11 5360,8310 4780,8310 4780,7780 5140,7780 5140,6810 5450,6810 5550,6710
NetQ501_1_2 on Top Layer "NETQ501_1_2_L01_P225" (solid, pour order 225): 4091.21,6530.05 4091.21,6715.19 4027.56,6715.19 4027.56,6109.42 4297.56,6109.42 4297.56,6323.71
NetQ501_4_2 on Top Layer "NETQ501_4_2_L01_P222" (solid, pour order 222): 4092.53,7627.47 4092.53,7812.6 4028.88,7812.6 4028.88,7206.83 4298.88,7206.83 4298.88,7421.12
EFUSE_RAW_OUT4 on Top Layer "EFUSE_RAW_OUT4_L01_P217" (solid, pour order 217): 4237.22,7112.71 4237.22,6752.71 3909.94,6752.71 3909.94,6932.71 4089.94,7112.71
EFUSE_RAW_OUT1 on Top Layer "EFUSE_RAW_OUT1_L01_P216" (solid, pour order 216): 4240,6022.52 4240,5662.52 3913.4,5662.52 3913.4,5842.52 4093.4,6022.52
SRC_1 on Top Layer "SRC_1_L01_P215" (solid, pour order 215): 4275.62,5682.26 4356.34,5682.26 4356.34,5692.64 4395.87,5732.17 4395.87,5860.9 4353.56,5860.9 4305.83,5813.17 4276.23,5813.17
NetQ501_3_2 on Top Layer "NETQ501_3_2_L01_P214" (solid, pour order 214): 5340,4569.68 5110,4569.68 5110,4488.89 5730,4488.89 5730,4758.89 5529.21,4758.89
CS-_3 on Top Layer "CS-_3_L01_P213" (solid, pour order 213): 6180,4895.5 6180,5239.68 5950,5239.68 5950,4895.5
EFUSE_RAW_OUT3 on Top Layer "EFUSE_RAW_OUT3_L01_P212" (solid, pour order 212): 5820,4699.68 6180,4699.68 6180,4389.68 6000,4389.68 5820,4569.68
EFUSE_RAW_OUT2 on Top Layer "EFUSE_RAW_OUT2_L01_P211" (solid, pour order 211): 4720,4703.63 5080,4703.63 5080,4393.63 4900,4393.63 4720,4573.63
NetQ501_2_2 on Top Layer "NETQ501_2_2_L01_P210" (solid, pour order 210): 4240,4573.16 4010,4573.16 4010,4492.37 4630,4492.37 4630,4762.37 4429.21,4762.37
CS-_2 on Top Layer "CS-_2_L01_P209" (solid, pour order 209): 5080,4898.98 5080,5243.16 4850,5243.16 4850,4898.98
SENSE_OUT1 on Top Layer "SENSE_OUT1_L01_P208" (solid, pour order 208): 3636.81,5794.11 3758.67,5794.11 3758.67,5663.96 3570,5663.96 3570,5399.68 3320,5399.68 3320,6209.68 3636.81,6209.68
CS-_4 on Top Layer "CS-_4_L01_P207" (solid, pour order 207): 4432.58,6756.41 4776.76,6756.41 4776.76,6986.41 4432.58,6986.41
SRC_4 on Top Layer "SRC_4_L01_P206" (solid, pour order 206): 4395.09,6959.02 4394.83,6959.28 4314.37,6959.28 4314.37,6948.65 4274.84,6909.12 4274.84,6778.84 4315.61,6778.84 4364.89,6828.12 4394.49,6828.12
CS-_1 on Top Layer "CS-_1_L01_P203" (solid, pour order 203): 4433,5658.58 4777.19,5658.58 4777.19,5888.58 4433,5888.58
SRC_3 on Top Layer "SRC_3_L01_P201" (solid, pour order 201): 5977.39,4858.01 5977.13,4857.75 5977.13,4777.29 5987.76,4777.29 6027.29,4737.76 6157.57,4737.76 6157.57,4778.53 6108.29,4827.81 6108.29,4857.41
SRC_2 on Top Layer "SRC_2_L01_P199" (solid, pour order 199): 4877.39,4861.49 4877.13,4861.24 4877.13,4780.77 4887.76,4780.77 4927.29,4741.25 5057.57,4741.25 5057.57,4782.01 5008.29,4831.29 5008.29,4860.89
I_SENSE_N on Top Layer "I_SENSE_N_L01_P057" (solid, pour order 57): 5140,5830 5280,5690 6670,5690 6670,5400 3570,5400 3570,5640 4930,5640 4930,7780 5140,7780
I_SENSE_P on Top Layer "I_SENSE_P_L01_P197" (solid, pour order 197): 5526.77,6030 5525.46,6031.31 5525.46,6086.08 6440,6086.08 6440,5710 5570,5710 5569.61,5710.39 5410,5710.39 5410,5770 5260,5770 5260,5860 5420,5860 5440,5880 5440,6030
IN1 on Top Layer "IN1_L01_P072" (solid, pour order 72): 5570,8100 5570,7290 5920,7290 5920,7390 5810,7500 5810,8010 5720,8100
IN2 on Top Layer "IN2_L01_P088" (solid, pour order 88): 6460,7750 6460,7490 6370,7400 6370,7290 6050,7290 6050,7400 6200,7550 6200,7870 6430,8100 6580,8100 6580,7870
GND on PWR "GND_L03_P233" (solid, pour order 233): 2870,3320 2870,8661.42 6680,8661.42 6680,3320
CS-_4 on PWR "CS-_4_L03_P220" (solid, remove dead copper, pour order 220): 4432.58,6756.41 4776.76,6756.41 4776.76,6986.41 4432.58,6986.41
NetQ501_1_2 on PWR "NETQ501_1_2_L03_P232" (solid, pour order 232): 4091.21,6530.05 4091.21,6715.19 4027.56,6715.19 4027.56,6109.42 4297.56,6109.42 4297.56,6323.71
NetQ501_4_2 on PWR "NETQ501_4_2_L03_P230" (solid, pour order 230): 4092.53,7627.47 4092.53,7812.6 4028.88,7812.6 4028.88,7206.83 4298.88,7206.83 4298.88,7421.12
SENSE_OUT4 on PWR "SENSE_OUT4_L03_P227" (solid, pour order 227): 3636.81,6934.98 3761.3,6934.98 3761.3,6804.93 3636.81,6804.93 3636.81,6459.68 3320,6459.68 3320,7280 3636.81,7280
SENSE_OUT2 on PWR "SENSE_OUT2_L03_P226" (solid, pour order 226): 4903.72,4237.61 4776.25,4110.14 4066.38,4110.14 4066.38,3774.05 5033.36,3774.05 5033.36,4237.61
SENSE_OUT3 on PWR "SENSE_OUT3_L03_P224" (solid, pour order 224): 6000.36,4233.24 5872.89,4105.77 5163.02,4105.77 5163.02,3769.68 6130,3769.68 6130,4233.24
SENSE_OUT1 on PWR "SENSE_OUT1_L03_P223" (solid, pour order 223): 3636.81,5794.11 3758.67,5794.11 3758.67,5663.96 3570,5663.96 3570,5399.68 3320,5399.68 3320,6209.68 3636.81,6209.68
CS-_1 on PWR "CS-_1_L03_P219" (solid, pour order 219): 4433,5658.58 4777.19,5658.58 4777.19,5888.58 4433,5888.58
EFUSE_RAW_OUT1 on PWR "EFUSE_RAW_OUT1_L03_P218" (solid, pour order 218): 4240,6022.52 4240,5662.52 3913.4,5662.52 3913.4,5842.52 4093.4,6022.52
EFUSE_RAW_OUT4 on PWR "EFUSE_RAW_OUT4_L03_P205" (solid, pour order 205): 4237.22,7112.71 4237.22,6752.71 3909.94,6752.71 3909.94,6932.71 4089.94,7112.71
EFUSE_RAW_OUT2 on PWR "EFUSE_RAW_OUT2_L03_P204" (solid, pour order 204): 4720,4703.63 5080,4703.63 5080,4393.63 4900,4393.63 4720,4573.63
NetQ501_3_2 on PWR "NETQ501_3_2_L03_P202" (solid, pour order 202): 5340,4569.68 5110,4569.68 5110,4488.89 5730,4488.89 5730,4758.89 5529.21,4758.89
NetQ501_2_2 on PWR "NETQ501_2_2_L03_P200" (solid, pour order 200): 4240,4573.16 4010,4573.16 4010,4492.37 4630,4492.37 4630,4762.37 4429.21,4762.37
CS-_3 on PWR "CS-_3_L03_P198" (solid, pour order 198): 6180,4895.5 6180,5239.68 5950,5239.68 5950,4895.5
CS-_2 on PWR "CS-_2_L03_P195" (solid, pour order 195): 5080,4898.98 5080,5243.16 4850,5243.16 4850,4898.98
EFUSE_RAW_OUT3 on PWR "EFUSE_RAW_OUT3_L03_P194" (solid, pour order 194): 5820,4699.68 6180,4699.68 6180,4389.68 6000,4389.68 5820,4569.68
VSYS_IN on PWR "VSYS_IN_L03_P087" (solid, pour order 87): 5550,6490 5610,6430 6440,6430 6440,7280 5576.89,7280 5576.89,8093.11 5360,8310 4780,8310 4780,7780 5140,7780 5140,6810 5450,6810 5550,6710
I_SENSE_N on PWR "I_SENSE_N_L03_P030" (solid, pour order 30): 5140,5830 5280,5690 6670,5690 6670,5400 3570,5400 3570,5640 4930,5640 4930,7780 5140,7780
IN2 on PWR "IN2_L03_P025" (solid, pour order 25): 6460,7750 6460,7490 6370,7400 6370,7290 6050,7290 6050,7400 6200,7550 6200,7870 6430,8100 6580,8100 6580,7870
IN1 on PWR "IN1_L03_P027" (solid, pour order 27): 5570,8100 5570,7290 5920,7290 5920,7390 5810,7500 5810,8010 5720,8100
SOURCE on PWR "SOURCE_L03_P045" (solid, pour order 45): 5600,6120 5600,6240 5640,6280 5640,6420 6100,6420 6420,6420 6420,6290 6370,6240 6370,6120
I_SENSE_P on PWR "I_SENSE_P_L03_P051" (solid, pour order 51): 5526.77,6030 5525.46,6031.31 5525.46,6086.08 6440,6086.08 6440,5710 5570,5710 5569.61,5710.39 5410,5710.39 5410,5770 5260,5770 5260,5860 5420,5860 5440,5880 5440,6030
GND on GND2 "GND_L05_P068" (solid, remove dead copper, pour order 68): 2870,3320 2870,8661.42 6680,8661.42 6680,3320
GND on GND1 "GND_L02_P069" (solid, remove dead copper, pour order 69): 2870,3320 2870,8661.42 6680,8661.42 6680,3320
NetQ501_4_2 on Bottom Layer "NETQ501_4_2_L06_P029" (solid, pour order 29): 4178.47,7541.53 4028.88,7541.53 4028.88,7206.83 4298.88,7206.83 4298.88,7421.12
NetQ501_1_2 on Bottom Layer "NETQ501_1_2_L06_P032" (solid, pour order 32): 4231.27,6390 4027.56,6390 4027.56,6109.42 4297.56,6109.42 4297.56,6323.71
EFUSE_RAW_OUT1 on Bottom Layer "EFUSE_RAW_OUT1_L06_P035" (solid, pour order 35): 4240,6022.84 4240,5662.84 3913.4,5662.84 3913.4,5842.84 4093.4,6022.84
SENSE_OUT3 on Bottom Layer "SENSE_OUT3_L06_P038" (solid, pour order 38): 6000.36,4233.56 5872.89,4106.09 5163.02,4106.09 5163.02,3770 6130,3770 6130,4233.56
SENSE_OUT2 on Bottom Layer "SENSE_OUT2_L06_P040" (solid, pour order 40): 4903.72,4237.93 4776.25,4110.46 4066.38,4110.46 4066.38,3774.37 5033.36,3774.37 5033.36,4237.93
SENSE_OUT1 on Bottom Layer "SENSE_OUT1_L06_P041" (solid, pour order 41): 3636.81,5794.43 3758.67,5794.43 3758.67,5664.28 3570,5664.28 3570,5400 3320,5400 3320,6210 3636.81,6210
VSYS_IN on Bottom Layer "VSYS_IN_L06_P054" (solid, pour order 54): 5550,6490 5610,6430 6440,6430 6440,7280 5576.89,7280 5576.89,8093.11 5360,8310 4780,8310 4780,7780 5140,7780 5140,6810 5450,6810 5550,6710
GND on Bottom Layer "GND_L06_P093" (solid, remove dead copper, pour order 93): 2870,3320 2870,8661.42 6680,8661.42 6680,3320
CS-_1 on Bottom Layer "CS-_1_L06_P090" (solid, pour order 90): 4433,5658.9 4777.19,5658.9 4777.19,5816.5 4433,5816.5
EFUSE_RAW_OUT2 on Bottom Layer "EFUSE_RAW_OUT2_L06_P089" (solid, pour order 89): 4720,4703.95 5080,4703.95 5080,4393.95 4900,4393.95 4720,4573.95
SENSE_OUT4 on Bottom Layer "SENSE_OUT4_L06_P084" (solid, pour order 84): 3636.81,6935.3 3761.3,6935.3 3761.3,6805.25 3636.81,6805.25 3636.81,6460 3320,6460 3320,7280.32 3636.81,7280.32
EFUSE_RAW_OUT4 on Bottom Layer "EFUSE_RAW_OUT4_L06_P082" (solid, pour order 82): 4237.22,7113.03 4237.22,6753.03 3909.94,6753.03 3909.94,6933.03 4089.94,7113.03
CS-_4 on Bottom Layer "CS-_4_L06_P077" (solid, pour order 77): 4432.58,6756.73 4776.76,6756.73 4776.76,6986.73 4432.58,6986.73
NetQ501_3_2 on Bottom Layer "NETQ501_3_2_L06_P073" (solid, pour order 73): 5340,4570 5110,4570 5110,4489.21 5730,4489.21 5730,4759.21 5529.21,4759.21
NetQ501_2_2 on Bottom Layer "NETQ501_2_2_L06_P064" (solid, pour order 64): 4240,4573.48 4010,4573.48 4010,4492.69 4630,4492.69 4630,4762.69 4429.21,4762.69
CS-_3 on Bottom Layer "CS-_3_L06_P061" (solid, pour order 61): 6180,4895.82 6180,5240 5950,5240 5950,4895.82
CS-_2 on Bottom Layer "CS-_2_L06_P058" (solid, pour order 58): 5080,4899.3 5080,5243.48 4850,5243.48 4850,4899.3
EFUSE_RAW_OUT3 on Bottom Layer "EFUSE_RAW_OUT3_L06_P055" (solid, pour order 55): 5820,4700 6180,4700 6180,4390 6000,4390 5820,4570
I_SENSE_N on Bottom Layer "I_SENSE_N_L06_P078" (solid, remove dead copper, pour order 78): 5140,5830 5280,5690 6670,5690 6670,5400 3570,5400 3570,5640 4930,5640 4930,7780 5140,7780
IN2 on Bottom Layer "IN2_L06_P092" (solid, pour order 92): 6460,7750 6460,7490 6370,7400 6370,7290 6050,7290 6050,7400 6200,7550 6200,7870 6430,8100 6580,8100 6580,7870
IN1 on Bottom Layer "IN1_L06_P091" (solid, pour order 91): 5570,8100 5570,7290 5920,7290 5920,7390 5810,7500 5810,8010 5720,8100
GND on SIG "GND_L04_P234" (solid, pour order 234): 2870,3320 2870,8661.42 6680,8661.42 6680,3320

## Keep-outs
Keep-Out Layer:
  region: 3748.11,7958.11 3748.11,7721.89 3511.89,7721.89 3511.89,7958.11
  region: 6618.11,4768.11 6618.11,4531.89 6381.89,4531.89 6381.89,4768.11
  region: 3748.11,4768.11 3748.11,4531.89 3511.89,4531.89 3511.89,4768.11
  lines w10: 2860,3320 2860,8680 6680,8680 6680,3320 2860,3320

## Silkscreen, mask and mechanical layers (free items; w line width, h text height)
Top Overlay:
  circle w10: c6500,4650 r100
  circle w10: c3630,4650 r100
  circle w10: c3630,7840 r100
Bottom Overlay:
  circle w10: c6500,4650 r100
  circle w10: c3630,4650 r100
  circle w10: c3630,7840 r100